# Altium PCB A5000_SingleBackplane.PcbDoc
Units mm, origin at the board's own origin, x right, y up, seen from the top; angles counter-clockwise.
Board outline 96.27 x 25.4 mm, 2 copper layers (Top Layer, Bottom Layer), stack 1.871 mm thick; 7 components, 54 nets, 188 pads, 20 vias.
Unrouted connection lines stored in the file: 1.
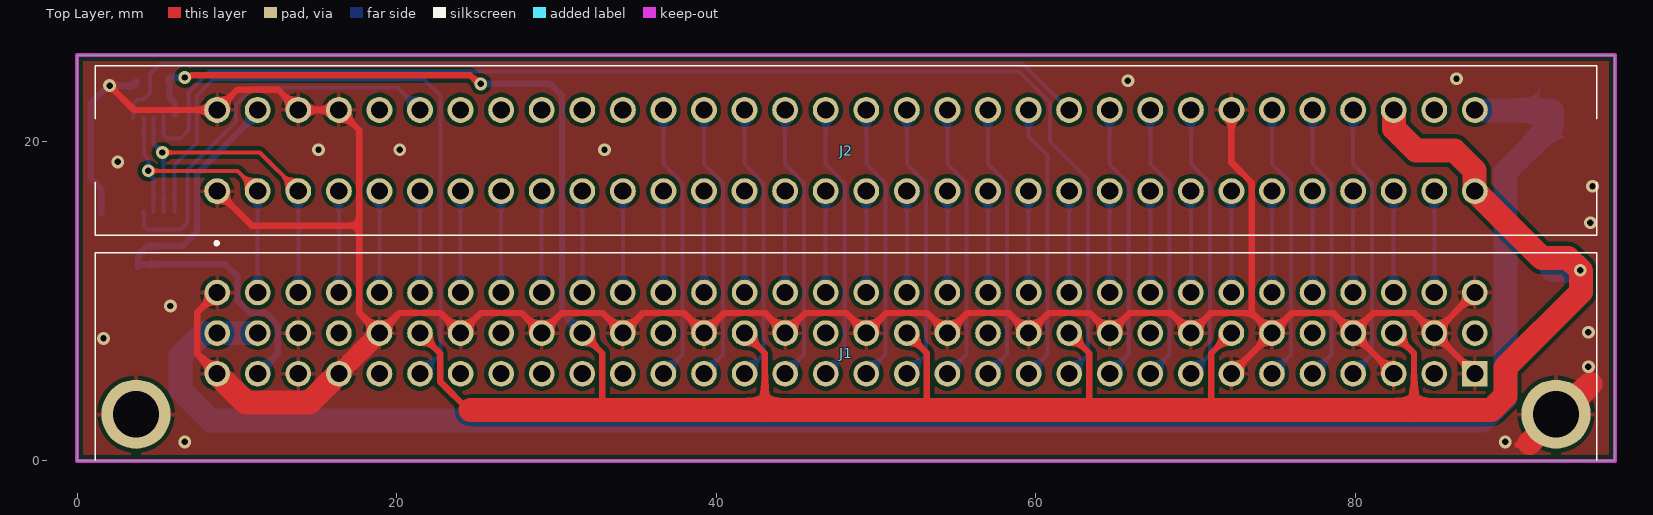
[diagram p0: Top Layer view]
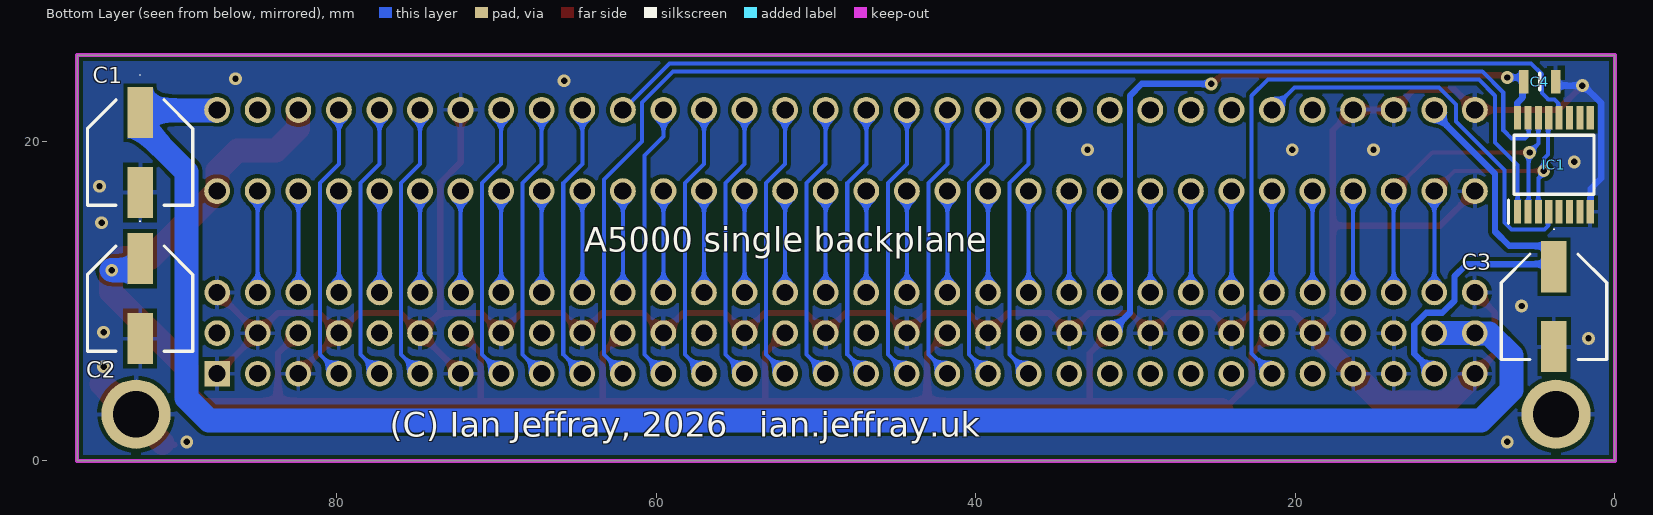
[diagram p1: Bottom Layer view, seen from below]

## Layer stack, top to bottom
Top Solder: solder mask 0.0102, Solder Resist, Dk 3.5
Top Layer: signal copper 0.0356
Dielectric 1: dielectric 0.2, FR-4, Dk 4.8
Dielectric 2: core 1.4, PP-006, Dk 4.1
Dielectric2: dielectric 0.2, FR-4, Dk 4.8
Bottom Layer: signal copper 0.0356
Bottom Solder: solder mask 0.0102, Solder Resist, Dk 3.5

## Board outline
0,0 0,25.4 96.266,25.4 96.266,0

## Design rules (kind name [scope] priority, off if disabled: settings)
Clearance [All] p1: gap=0.254 ignorepadtopadclearanceinfootprint=FALSE except(0: Arc-Hole Track-Hole SMDPad-Hole THPad-Hole Via-Hole Fill-Hole Poly-Hole Region-Hole Text-Hole; 0.1: SMDPad-SMDPad SMDPad-Fill SMDPad-Poly SMDPad-Region Fill-Fill Fill-Poly Fill-Region Poly-Poly Poly-Region Region-Region)
HoleSize [All] p1: absolutevalues=TRUE maxlimit=4 minlimit=0.025 maxpercent=80.000 minpercent=20.000
PolygonConnect [All] p1: connectstyle=Relief reliefconductorwidth=0.254 reliefentries=4 polygonreliefangle="90 Angle" airgapwidth=0.254
RoutingVias [All] p1: holewidth=0.711 width=1.27 viastyle="Through Hole" minholewidth=0.4 minwidth=0.8 maxholewidth=0.711 maxwidth=1.27
SilkToSolderMaskClearance [IsPad] p1: minsilkscreentomaskgap=0.1 clearancetoexposedcopper=TRUE
SolderMaskExpansion [All] p1: expansion=0.102 istentingtop=FALSE
SupplyNets "Schematic Supply Nets_4" [InNet('0V')] p1: voltage=0.000
SupplyNets "Schematic Supply Nets_3" [InNet('5V')] p2: voltage=0.000
SupplyNets "Schematic Supply Nets_1" [InNet('-5V')] p3: voltage=0.000
SupplyNets "Schematic Supply Nets" [InNet('12V')] p4: voltage=0.000
Width [All] p1: maxlimit=2 minlimit=0.254 preferedwidth=0.254
28 further rules are at their usual default settings.

## Components (designator, comment, footprint, x,y, rotation, side; value= is the part's Value field where it differs from the comment)
C1 "47uF" EEE1AA101SP 92.329,19.304 r270 bottom
C2 "47uF" EEE1AA101SP 92.329,10.16 r270 bottom
C3 "47uF" EEE1AA101SP 3.81,9.652 r270 bottom
C4 "100nF" CAPC2012X145N 4.699,23.749 r0 bottom
IC1 "74HC139PW,112" SOP65P640X110-16N 3.81,18.542 r90 bottom
J1 "650947-5" 6509475 87.503,5.461 r0 top locked
J2 "5650956-5" 56509565 8.763,16.891 r180 top locked

## Footprints (in the part's own frame and the unit in brackets; to place one, negate y for a bottom-side part, rotate by r counter-clockwise, add the part's x,y. Pads: shape width x height; smd on the part's side, far side on the other; paste and mask are expansions set on the pad)
6509475 [mm]
  rect 1.605x1.605 hole 1.07: A1(0,0)
  round 1.605 hole 1.07: A2(-2.54,0) A3(-5.08,0) A4(-7.62,0) A5(-10.16,0) A6(-12.7,0) A7(-15.24,0) A8(-17.78,0) A9(-20.32,0) A10(-22.86,0) A11(-25.4,0) A12(-27.94,0) A13(-30.48,0) A14(-33.02,0) A15(-35.56,0) A16(-38.1,0) A17(-40.64,0) A18(-43.18,0) A19(-45.72,0) A20(-48.26,0) A21(-50.8,0) A22(-53.34,0) A23(-55.88,0) A24(-58.42,0) A25(-60.96,0) A26(-63.5,0) A27(-66.04,0) A28(-68.58,0) A29(-71.12,0) A30(-73.66,0) A31(-76.2,0) A32(-78.74,0) B1(0,2.54) B2(-2.54,2.54) B3(-5.08,2.54) B4(-7.62,2.54) B5(-10.16,2.54) B6(-12.7,2.54) B7(-15.24,2.54) B8(-17.78,2.54) B9(-20.32,2.54) B10(-22.86,2.54) B11(-25.4,2.54) B12(-27.94,2.54) B13(-30.48,2.54) B14(-33.02,2.54) B15(-35.56,2.54) B16(-38.1,2.54) B17(-40.64,2.54) B18(-43.18,2.54) B19(-45.72,2.54) B20(-48.26,2.54) B21(-50.8,2.54) B22(-53.34,2.54) B23(-55.88,2.54) B24(-58.42,2.54) B25(-60.96,2.54) B26(-63.5,2.54) B27(-66.04,2.54) B28(-68.58,2.54) B29(-71.12,2.54) B30(-73.66,2.54) B31(-76.2,2.54) B32(-78.74,2.54) C1(0,5.08) C2(-2.54,5.08) C3(-5.08,5.08) C4(-7.62,5.08) C5(-10.16,5.08) C6(-12.7,5.08) C7(-15.24,5.08) C8(-17.78,5.08) C9(-20.32,5.08) C10(-22.86,5.08) C11(-25.4,5.08) C12(-27.94,5.08) C13(-30.48,5.08) C14(-33.02,5.08) C15(-35.56,5.08) C16(-38.1,5.08) C17(-40.64,5.08) C18(-43.18,5.08) C19(-45.72,5.08) C20(-48.26,5.08) C21(-50.8,5.08) C22(-53.34,5.08) C23(-55.88,5.08) C24(-58.42,5.08) C25(-60.96,5.08) C26(-63.5,5.08) C27(-66.04,5.08) C28(-68.58,5.08) C29(-71.12,5.08) C30(-73.66,5.08) C31(-76.2,5.08) C32(-78.74,5.08)
  round 4.335 hole 2.89: MH1(5.08,-2.54) MH2(-83.82,-2.54)
  silkscreen extent -86.37,-5.41 7.63,7.56, body extent -86.29,-12.65 7.55,5.37, height 9.63
56509565 [mm]
  round 1.62 hole 1.08: A1(0,0) A2(-2.54,0) A3(-5.08,0) A4(-7.62,0) A5(-10.16,0) A6(-12.7,0) A7(-15.24,0) A8(-17.78,0) A9(-20.32,0) A10(-22.86,0) A11(-25.4,0) A12(-27.94,0) A13(-30.48,0) A14(-33.02,0) A15(-35.56,0) A16(-38.1,0) A17(-40.64,0) A18(-43.18,0) A19(-45.72,0) A20(-48.26,0) A21(-50.8,0) A22(-53.34,0) A23(-55.88,0) A24(-58.42,0) A25(-60.96,0) A26(-63.5,0) A27(-66.04,0) A28(-68.58,0) A29(-71.12,0) A30(-73.66,0) A31(-76.2,0) A32(-78.74,0) C1(0,-5.08) C2(-2.54,-5.08) C3(-5.08,-5.08) C4(-7.62,-5.08) C5(-10.16,-5.08) C6(-12.7,-5.08) C7(-15.24,-5.08) C8(-17.78,-5.08) C9(-20.32,-5.08) C10(-22.86,-5.08) C11(-25.4,-5.08) C12(-27.94,-5.08) C13(-30.48,-5.08) C14(-33.02,-5.08) C15(-35.56,-5.08) C16(-38.1,-5.08) C17(-40.64,-5.08) C18(-43.18,-5.08) C19(-45.72,-5.08) C20(-48.26,-5.08) C21(-50.8,-5.08) C22(-53.34,-5.08) C23(-55.88,-5.08) C24(-58.42,-5.08) C25(-60.96,-5.08) C26(-63.5,-5.08) C27(-66.04,-5.08) C28(-68.58,-5.08) C29(-71.12,-5.08) C30(-73.66,-5.08) C31(-76.2,-5.08) C32(-78.74,-5.08)
  round 4.335 on Mech16: MH1(-84.365,-2.54) MH2(5.625,-2.54)
  silkscreen extent -86.37,-7.84 7.62,3.36, body extent -86.3,-7.8 7.56,2.8, height 11.58
CAPC2012X145N [mm]
  rect 0.62x1.47 smd: 1(-1,0) 2(1,0)
  silkscreen extent 0,-0.53 0,0.53, body extent -1,-0.63 1,0.63, height 1.45
EEE1AA101SP [mm]
  rect 3.2x1.6 smd: 1(-2.5,0) 2(2.5,0)
  silkscreen extent -4.88,-3.3 3.3,3.3, body extent -3.65,-3.3 3.65,3.3, height 5.8
SOP65P640X110-16N [mm]
  rect 1.475x0.45 smd: 1(-2.938,2.275) 2(-2.938,1.625) 3(-2.938,0.975) 4(-2.938,0.325) 5(-2.938,-0.325) 6(-2.938,-0.975) 7(-2.938,-1.625) 8(-2.938,-2.275) 9(2.938,-2.275) 10(2.938,-1.625) 11(2.938,-0.975) 12(2.938,-0.325) 13(2.938,0.325) 14(2.938,0.975) 15(2.938,1.625) 16(2.938,2.275)
  silkscreen extent -3.67,-2.5 1.85,2.85, body extent -3.21,-2.5 3.21,2.5, height 0.98

## Part data
C1 C2 C3: library part EEE1VA470WP, "Capacitor Polarised", Manufacturer_Name=Panasonic, Datasheet Link=http://industrial.panasonic.com/cdbs/www-data/pdf/RDE0000/ABA0000C1145.pdf, Height=7.8mm, Manufacturer_Part_Number=EEE1VA470WP
C4: library part C2012X7R2A104K125AA, "Capacitor", Manufacturer_Name=TDK, Mouser Part Number=810-C2012X7R2A104K, Arrow Part Number=C2012X7R2A104K125AA, Arrow Price/Stock=https://www.arrow.com/en/products/c2012x7r2a104k125aa/tdk, Datasheet Link=https://product.tdk.com/info/en/catalog/datasheets/mlcc_commercial_midvoltage_en.pdf, Height=1.45mm, Manufacturer_Part_Number=C2012X7R2A104K125AA, Mouser Price/Stock=https://www.mouser.co.uk/ProductDetail/TDK/C2012X7R2A104K125AA?qs=NRhsANhppD9J0ZsT2%2Fo%2F7Q%3D%3D
IC1: "Integrated Circuit", Manufacturer_Name=Nexperia, Mouser Part Number=771-HC139PW112, Datasheet Link=https://assets.nexperia.com/documents/data-sheet/74HC_HCT139.pdf, Height=1.1mm, Manufacturer_Part_Number=74HC139PW,112, Mouser Price/Stock=https://www.mouser.com/Search/Refine.aspx?Keyword=771-HC139PW112
J1: "Connector", Manufacturer_Name="TE Connectivity", Mouser Part Number=571-6509475, Arrow Part Number=650947-5, Arrow Price/Stock=https://www.arrow.com/en/products/650947-5/te-connectivity, Datasheet Link=http://www.te.com/commerce/DocumentDelivery/DDEController?Action=srchrtrv&DocNm=650947&DocType=Customer+Drawing&DocLang=English, Height=11.1mm, Manufacturer_Part_Number=650947-5, Mouser Price/Stock=https://www.mouser.co.uk/ProductDetail/TE-Connectivity/650947-5?qs=A%252B%2FNCR0PvNW83cU5ePdpGw%3D%3D
J2: "Connector", Manufacturer_Name="TE Connectivity", Mouser Part Number=571-5650956-5, Datasheet Link=https://componentsearchengine.com/Datasheets/2/5650956-5.pdf, Height=11.51mm, Manufacturer_Part_Number=5650956-5, Mouser Price/Stock=https://www.mouser.co.uk/ProductDetail/TE-Connectivity/5650956-5?qs=U4pz39agNJCw%2F9%252BN9Cdy%2Fg%3D%3D

## Via types
v1: diameter 0.8, hole 0.4, Top Layer to Bottom Layer, tented both sides, 20 vias

## Nets (pads, with @x,y where several pads share a name; then routed paths per layer and width w, separated by ;. In a path a pad name is that pad's centre, name@x,y a point inside that pad or via, vN(x,y) a via of type N, cw(c..) or ccw(c..) an arc to the next point about the centre after c; other vN are vias at no path point)
0V: C1.2 C2.2 C3.2 C4.1 IC1.8 J1.A1 J1.A3 J1.A7 J1.A29 J1.A30 J1.A32 J1.B2 J1.B4 J1.B6 J1.B8 J1.B10 J1.B12 J1.B14 J1.B16 J1.B18 J1.B20 J1.B22 J1.B24 J1.B26 J1.B28 J1.B30 J1.C1 J1.C32 J1.MH1 J1.MH2 J2.A1 J2.C1 J2.C3 J2.C4 J2.C26 | length 183.7
  Top Layer w0.4: v1(2.032,23.495) 3.556,21.971 J2.C1 10.027,23.235 12.579,23.235 J2.C3 J2.C4 17.654,20.7 17.654,14.732 ; J1.A32 7.507,6.717 7.507,9.285 J1.C32 ; J2.A1 10.922,14.732 17.654,14.732 ; J1.A7 J1.B6 ; J2.C26 72.263,18.679 73.527,17.415 73.527,9.277 73.547,9.257 ; J1.A3 J1.B4 ; J1.A1 J1.B2 ; J1.C1 J1.B2 ; 90.17,1.016 90.817,1.016 90.932,1.131 ; 17.654,14.732 17.654,9.27 J1.B28 20.179,9.257 22.747,9.257 J1.B26 25.259,9.257 27.827,9.257 J1.B24 30.339,9.257 32.907,9.257 J1.B22 35.419,9.257 37.987,9.257 J1.B20 40.499,9.257 43.067,9.257 J1.B18 45.579,9.257 48.147,9.257 J1.B16 50.659,9.257 53.227,9.257 J1.B14 55.739,9.257 58.307,9.257 J1.B12 60.819,9.257 63.387,9.257 J1.B10 65.899,9.257 68.467,9.257 J1.B8 70.979,9.257 73.547,9.257 ; 73.547,9.257 J1.B6 ; J1.B6 76.059,9.257 78.627,9.257 J1.B4 ; J1.B4 81.139,9.257 83.707,9.257 J1.B2
  Top Layer w1.2: J1.A29 J1.B28
  Top Layer w1.5: J1.A32 8.763,5.446 10.555,3.654 14.548,3.654 16.355,5.461 J1.A29 ; 90.932,1.131 92.583,2.782 J1.MH1 ; J1.MH1@92.71,2.794 94.742,4.826
  Bottom Layer w0.4: IC1.8@1.506,15.494 1.506,17.036 0.856,17.686 0.856,22.406 1.945,23.495 3.589,23.495 3.699,23.605 C4.1
  other v1: 6.728,1.19 89.405,1.19 94.612,5.889 1.648,7.667 94.612,8.048 5.839,9.699 94.739,14.906 94.866,17.192 2.537,18.716 15.11,19.478 20.19,19.478 33.017,19.478 65.783,23.796 86.357,23.923
5V: C2.1 C4.2 IC1.16 J1.B3 J1.B7 J1.B11 J1.B15 J1.B19 J1.B23 J1.B27 J2.A32 J2.C30 | length 176.3
  Top Layer w0.4: v1(6.731,24.003) 6.808,24.08 7.09,24.08 7.16,24.149 24.619,24.149 25.165,23.603 v1(25.273,23.603) ; J1.B27 22.719,6.745 22.719,4.968 24.512,3.175 24.638,3.175 ; J1.B23 32.879,6.745 32.879,3.288 32.766,3.175 ; J1.B19 43.053,6.731 43.053,3.175 ; J1.B15 53.199,6.745 53.199,3.288 53.086,3.175 ; J1.B11 63.359,6.745 63.359,3.288 63.246,3.175 ; 71.12,3.175 71.007,3.288 71.007,6.745 J1.B7 ; J1.B3 83.693,6.731 83.693,3.175
  Top Layer w1.5: 24.638,3.175 32.766,3.175 43.053,3.175 53.086,3.175 63.246,3.175 71.12,3.175 83.693,3.175 88.529,3.175 89.408,4.054 89.408,5.842 94.145,10.579 94.145,11.9 v1(94.107,11.938) 93.345,12.7 91.694,12.7 87.48,16.914 87.48,18.187 86.235,19.433 83.818,19.433 82.446,20.805 82.446,21.948 J2.C30
  Bottom Layer w0.4: IC1.16@6.114,21.682 6.114,22.406 5.782,22.738 5.782,23.666 C4.2 5.699,23.893 5.809,24.003 v1(6.731,24.003) ; v1(25.273,23.603) 29.61,23.603 30.353,22.86 30.353,9.271 J1.B23
  Bottom Layer w1.5: C2.1 92.329,11.988 92.379,11.938 v1(94.107,11.938)
12V: C1.1 J1.B31 J1.B32 J2.C32 | length 115.9
  Bottom Layer w1.5: J1.B31 J1.B32 8.743,7.981 7.868,7.981 6.477,6.59 6.477,4.445 8.382,2.54 88.025,2.54 89.412,3.927 89.412,18.086 92.329,21.004 92.329,21.898 92.279,21.948 87.526,21.948 J2.C32
-5V: C3.1 J1.A31 J2.C2 | length 29.1
  Bottom Layer w0.4: J1.A31 12.559,6.717 12.559,8.521 11.81,9.271 10.796,9.271 10.04,10.027 10.04,11.55 9.271,12.319 3.977,12.319 C3.1 3.81,12.319 3.81,12.862 4.41,13.462 6.604,13.462 7.499,14.357 7.499,17.98 11.303,21.784 J2.C2
/IOGT: J1.A10 J2.C23 | length 17.5
  Bottom Layer w0.254: J1.A10 65.834,6.652 65.834,17.384 64.643,18.575 J2.C23
/IORQ: J1.A9 J2.C24 | length 17.5
  Bottom Layer w0.254: J1.A9 68.374,6.652 68.374,17.384 67.183,18.575 J2.C24
/MS0: IC1.4 J2.C6 | length 25.1
  Bottom Layer w0.254: IC1.4 4.179,15.56 4.179,14.709 4.402,14.485 6.468,14.485 6.918,14.936 6.918,18.221 9.954,21.257 9.954,22.306 11.016,23.368 20.066,23.368 J2.C6
/PFIQ: J1.A16 J2.C17 | length 17.5
  Bottom Layer w0.254: J1.A16 50.594,6.652 50.594,17.384 49.403,18.575 J2.C17
/PIRQ: J1.A17 J2.C16 | length 17.5
  Bottom Layer w0.254: J1.A17 48.054,6.652 48.054,17.384 46.863,18.575 J2.C16
/PRE: J1.A18 J2.C15 | length 17.5
  Bottom Layer w0.254: J1.A18 45.514,6.652 45.514,17.384 44.323,18.575 J2.C15
/PS0: IC1.12 J2.C22 | length 62.4
  Bottom Layer w0.254: IC1.12 3.529,21.524 3.529,22.375 3.787,22.633 4.167,22.633 4.572,23.038 4.572,24.206 5.258,24.892 59.182,24.892 J2.C22
/PWE: J1.A19 J2.C14 | length 17.5
  Bottom Layer w0.254: J1.A19 42.974,6.652 42.974,17.384 41.783,18.575 J2.C14
/RST: J1.A21 J2.C12 | length 17.5
  Bottom Layer w0.254: J1.A21 37.894,6.652 37.894,17.384 36.703,18.575 J2.C12
/S4: IC1.15 J1.A11 | length 79.2
  Bottom Layer w0.254: IC1.15@5.391,21.607 5.391,20.419 5.631,20.178 6.462,20.178 6.985,20.701 6.985,22.596 6.985,23.07 8.299,24.384 8.773,24.384 58.972,24.384 60.912,22.444 60.912,19.987 63.294,17.605 63.294,6.652 J1.A11
/S6_UNIX: J1.A15 J2.C18 | length 17.5
  Bottom Layer w0.254: J1.A15 53.134,6.652 53.134,17.384 51.943,18.575 J2.C18
/S7: J1.A12 J2.C21 | length 17.5
  Bottom Layer w0.254: J1.A12 60.754,6.652 60.754,19.129 59.563,20.32 J2.C21
BD0: J1.C2 J2.A31 | length 6.3
  Bottom Layer w0.254: J1.C2 J2.A31
BD1: J1.C3 J2.A30 | length 6.3
  Bottom Layer w0.254: J1.C3 J2.A30
BD2: J1.C4 J2.A29 | length 6.3
  Bottom Layer w0.254: J1.C4 J2.A29
BD3: J1.C5 J2.A28 | length 6.3
  Bottom Layer w0.254: J1.C5 J2.A28
BD4: J1.C6 J2.A27 | length 6.3
  Bottom Layer w0.254: J1.C6 J2.A27
BD5: J1.C7 J2.A26 | length 6.3
  Bottom Layer w0.254: J1.C7 J2.A26
BD6: J1.C8 J2.A25 | length 6.3
  Bottom Layer w0.254: J1.C8 J2.A25
BD7: J1.C9 J2.A24 | length 6.3
  Bottom Layer w0.254: J1.C9 J2.A24
BD8: J1.C10 J2.A23 | length 6.3
  Bottom Layer w0.254: J1.C10 J2.A23
BD9: J1.C11 J2.A22 | length 6.3
  Bottom Layer w0.254: J1.C11 J2.A22
BD10: J1.C12 J2.A21 | length 6.3
  Bottom Layer w0.254: J1.C12 J2.A21
BD11: J1.C13 J2.A20 | length 6.3
  Bottom Layer w0.254: J1.C13 J2.A20
BD12: J1.C14 J2.A19 | length 6.3
  Bottom Layer w0.254: J1.C14 J2.A19
BD13: J1.C15 J2.A18 | length 6.3
  Bottom Layer w0.254: J1.C15 J2.A18
BD14: J1.C16 J2.A17 | length 6.3
  Bottom Layer w0.254: J1.C16 J2.A17
BD15: J1.C17 J2.A16 | length 6.3
  Bottom Layer w0.254: J1.C17 J2.A16
BL: J1.A8 J2.C25 | length 17.5
  Bottom Layer w0.254: J1.A8 70.914,6.652 70.914,17.384 69.723,18.575 J2.C25
C0: J1.A13 J2.C20 | length 17.5
  Bottom Layer w0.254: J1.A13 58.214,6.652 58.214,17.384 57.023,18.575 J2.C20
C1: J1.A14 J2.C19 | length 17.5
  Bottom Layer w0.254: J1.A14 55.674,6.652 55.674,17.384 54.483,18.575 J2.C19
CLK2: J1.A6 J2.C27 | length 17.5
  Bottom Layer w0.254: J1.A6 75.994,6.652 75.994,17.384 74.803,18.575 J2.C27
CLK8: J1.A5 J2.C28 | length 17.5
  Bottom Layer w0.254: J1.A5 78.534,6.652 78.534,17.384 77.343,18.575 J2.C28
LA2: J1.C18 J2.A15 | length 6.3
  Bottom Layer w0.254: J1.C18 J2.A15
LA3: J1.C19 J2.A14 | length 6.3
  Bottom Layer w0.254: J1.C19 J2.A14
LA4: J1.C20 J2.A13 | length 6.3
  Bottom Layer w0.254: J1.C20 J2.A13
LA5: J1.C21 J2.A12 | length 6.3
  Bottom Layer w0.254: J1.C21 J2.A12
LA6: J1.C22 J2.A11 | length 6.3
  Bottom Layer w0.254: J1.C22 J2.A11
LA7: J1.C23 J2.A10 | length 6.3
  Bottom Layer w0.254: J1.C23 J2.A10
LA8: J1.C24 J2.A9 | length 6.3
  Bottom Layer w0.254: J1.C24 J2.A9
LA9: J1.C25 J2.A8 | length 6.3
  Bottom Layer w0.254: J1.C25 J2.A8
LA10: J1.C26 J2.A7 | length 6.3
  Bottom Layer w0.254: J1.C26 J2.A7
LA11: J1.C27 J2.A6 | length 6.3
  Bottom Layer w0.254: J1.C27 J2.A6
LA12: J1.C28 J2.A5 | length 6.3
  Bottom Layer w0.254: J1.C28 J2.A5
LA13: J1.C29 J2.A4 | length 6.3
  Bottom Layer w0.254: J1.C29 J2.A4
LA14: IC1.2 IC1.14 J1.C30 J2.A3 | length 22
  Top Layer w0.254: v1(5.334,19.304) 11.43,19.304 J2.A3
  Bottom Layer w0.254: IC1.14 4.785,19.859 5.334,19.31 v1(5.334,19.304) 5.391,19.247 5.391,15.648 IC1.2 ; J1.C30 J2.A3
LA15: IC1.3 IC1.13 J1.C31 J2.A2 | length 19.9
  Top Layer w0.254: v1(4.445,18.161) 10.033,18.161 J2.A2
  Bottom Layer w0.254: IC1.13 4.179,21.436 4.179,19.189 4.445,18.923 4.445,18.013 4.785,17.673 IC1.3 ; J1.C31 J2.A2
LA21: IC1.1 J1.A27 | length 41.8
  Bottom Layer w0.254: IC1.1 6.085,18.531 7.493,19.939 7.493,22.86 8.509,23.876 21.717,23.876 22.733,22.86 22.733,6.731 J1.A27
PR/W: J1.A20 J2.C13 | length 17.5
  Bottom Layer w0.254: J1.A20 40.434,6.652 40.434,17.384 39.243,18.575 J2.C13
REF8M: J1.A4 J2.C29 | length 17.5
  Bottom Layer w0.254: J1.A4 81.074,6.652 81.074,17.384 79.883,18.575 J2.C29
pads on no net: IC1.5 IC1.6 IC1.7 IC1.9 IC1.10 IC1.11 J1.A2 J1.A22 J1.A23 J1.A24 J1.A25 J1.A26 J1.A28 J1.B1 J1.B5 J1.B9 J1.B13 J1.B17 J1.B21 J1.B25 J1.B29 J2.C5 J2.C7 J2.C8 J2.C9 J2.C10 J2.C11 J2.C31 J2.MH1 J2.MH2

## Polygon pours and split planes (outlines as drawn)
0V on Top Layer "0V_L01_P000" (solid, remove dead copper, pour order 0): 0,25.4 96.266,25.4 96.266,0 0,0
0V on Bottom Layer "0V_L02_P001" (solid, remove dead copper, pour order 1): 0,25.4 96.266,25.4 96.266,0 0,0

## Keep-outs
Keep-Out Layer:
  the board outline again, w0.254

## Silkscreen, mask and mechanical layers (free items; w line width, h text height)
Bottom Overlay:
  text "A5000 single backplane" at 64.516,13.081 h1.52
  text "(C) Ian Jeffray, 2026   ian.jeffray.uk" at 76.708,1.524 h1.52
Board Shape:
  the board outline again, w0.254